# Altium PCB GripperBottomBoard.PcbDoc (part 3 of 4)
Units mm, origin at the board's own origin, x right, y up, seen from the top; angles counter-clockwise.
Board outline 79.5 x 85 mm, 6 copper layers (Top Layer, GND 01, SIG 01, PWR, GND 02, Bottom Layer), stack 1.705 mm thick; 155 components, 93 nets, 613 pads, 240 vias.
Unrouted connection lines stored in the file: 155.
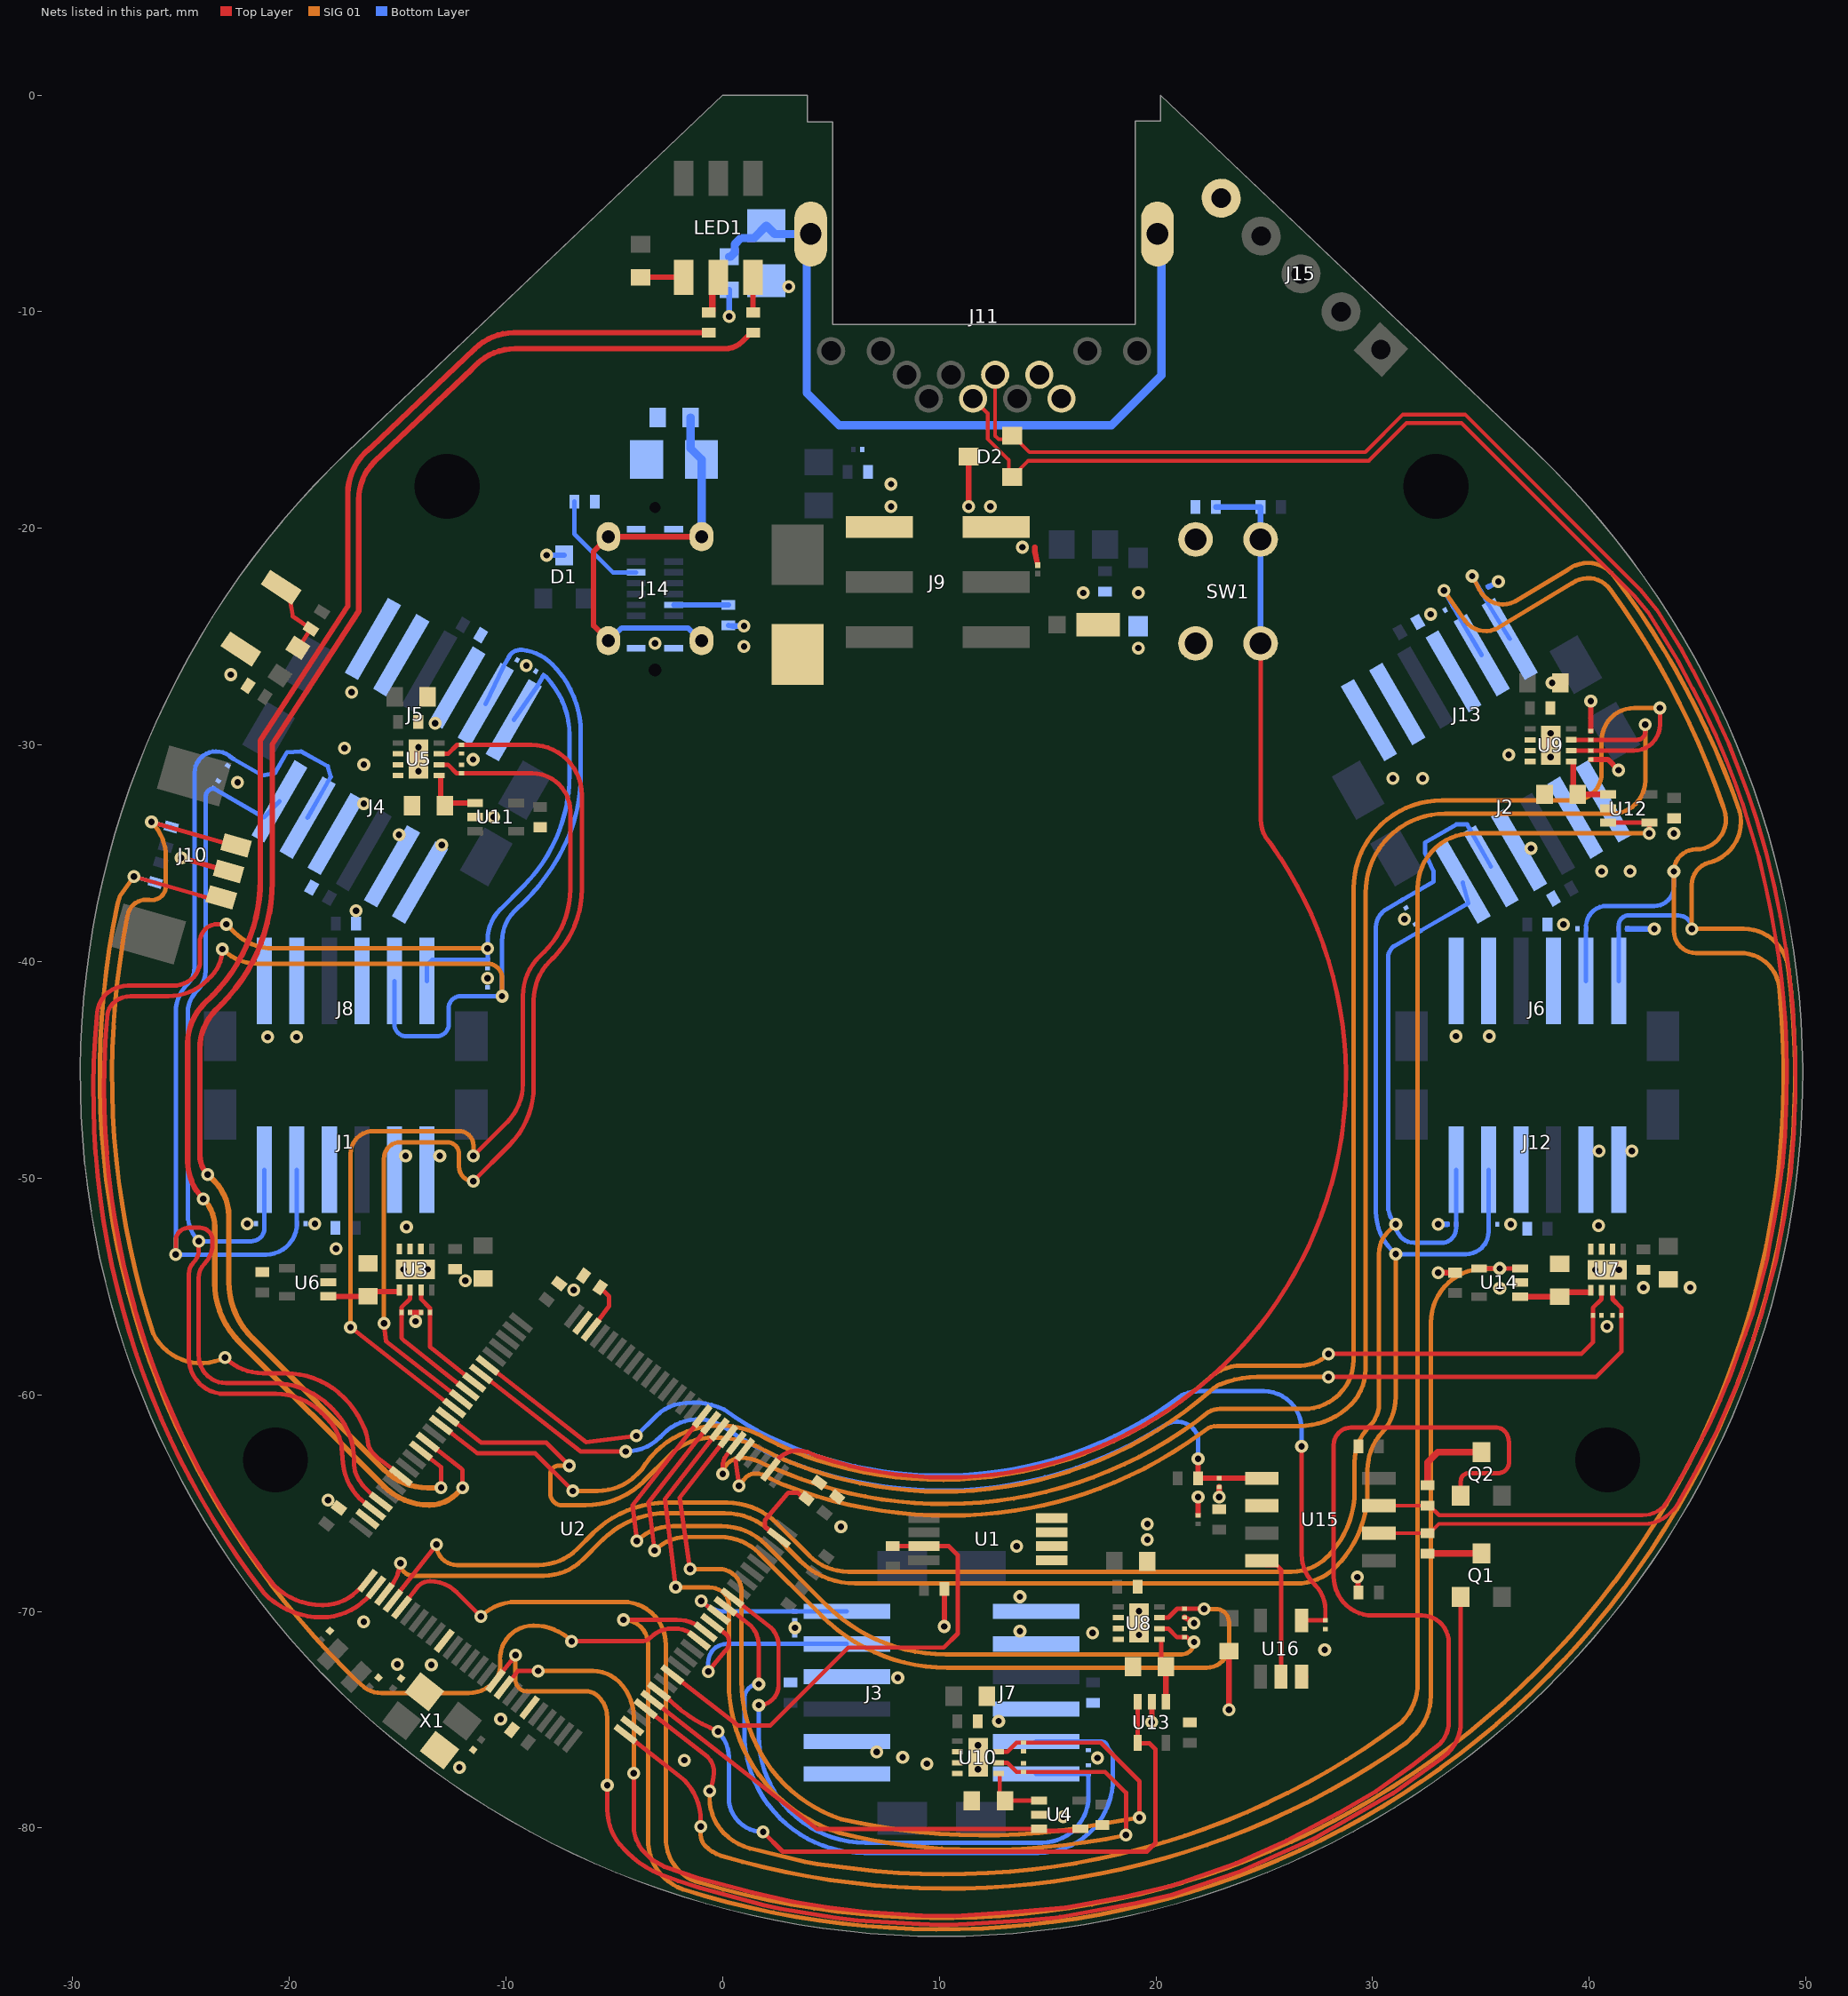
[diagram p6: the nets of this part, all layers, seen from the top]

## Via types
v1: diameter 0.6, hole 0.3, Top Layer to Bottom Layer, tented both sides, 240 vias

## Nets (pads, with @x,y where several pads share a name; then routed paths per layer and width w, separated by ;. In a path a pad name is that pad's centre, name@x,y a point inside that pad or via, vN(x,y) a via of type N, cw(c..) or ccw(c..) an arc to the next point about the centre after c; other vN are vias at no path point) (continued)
ADC_3: U2.26 U14.3 U14.4 | length 66.5
  Top Layer w0.203: U2.26@-4.104,-75.951 -4.084,-75.966 -1.844,-77.716 -1.785,-77.776 cw(c-3.647,-79.638) v1@-1.027,-79.909 ; U14.4@34.913,-54.166 v1(35.863,-54.167) U14.3@36.813,-54.167
  SIG 01 w0.203: v1(-1.014,-79.929) -1.014,-80.312 ccw(c-0.291,-80.312) -0.803,-80.823 ccw(c0.561,-79.46) -0.108,-81.268 -0.101,-81.27 ccw(c10.355,-46.023) 31.568,-76.051 31.945,-75.674 ccw(c30.156,-73.885) 32.687,-73.885 32.687,-56.666 cw(c35.186,-56.666) 35.186,-54.167 v1(35.863,-54.167)
ADC_4: U2.29 U12.3 U12.4 | length 93.9
  Top Layer w0.203: U2.29@-3.665,-74.39 -3.554,-74.478 -0.701,-76.706 ; -0.701,-76.706 cw(c-0.827,-76.866) -0.685,-76.72 cw(c-1.351,-77.399) -0.401,-77.448 cw(c-2.76,-77.326) v1(-0.6,-78.281) ; U12.3@40.87,-33.577 U12.4@42.77,-33.577 v1(42.77,-34.079)
  SIG 01 w0.203: v1(-0.6,-78.281) -0.6,-78.633 ccw(c1.684,-78.63) 0.071,-80.247 ccw(c1.944,-78.376) 1.263,-80.934 1.265,-80.935 3.799,-81.556 4.378,-81.666 6.062,-81.872 ccw(c10.32,-47.147) 31.331,-75.12 ccw(c29.535,-73.324) 32.075,-73.324 32.075,-36.619 cw(c34.615,-36.619) 34.615,-34.079 v1(42.77,-34.079)
ADC_5: U2.30 U4.3 U4.4 | length 22.3
  Top Layer w0.203: U2.30@-3.624,-73.8 U2.30@-3.251,-74.09 -2.858,-74.397 4.355,-80.033 U4.3@14.606,-80.033 14.689,-80.115 16.424,-80.115 U4.4@16.506,-80.033
ADC_6: U2.31 U13.3 U13.4 | length 35.3
  Top Layer w0.203: U2.31@-3.316,-73.406 U2.31@-2.943,-73.696 -2.545,-73.996 -2.537,-74.003 -2.528,-74.012 ccw(c2.097,-69.45) -0.22,-75.519 cw(c-0.293,-75.709) v1@-0.218,-75.52 ; v1(1.868,-80.174) 1.868,-80.181 2.772,-81.086 19.578,-81.086 19.973,-80.691 19.973,-76.355 19.708,-76.09 19.181,-76.09 U13.4@19.156,-76.065 U13.3@19.156,-74.165
  Bottom Layer w0.203: v1(-0.214,-75.538) cw(c-1.415,-76.739) 0.283,-76.739 0.283,-78.59 ccw(c1.868,-78.59) v1(1.868,-80.174)
B: R15.2 U2.91 | length 76.8
  Top Layer w0.203: U2.91@-13.926,-62.578 -13.773,-62.704 -13.542,-62.896 -12.997,-63.322 v1(-12.997,-64.291)
  Top Layer w0.254: v1(-23.765,-49.824) cw(c-22.889,-48.947) -24.129,-48.947 -24.129,-44.021 cw(c-21.589,-44.021) -23.385,-42.225 -23.138,-41.978 ccw(c-28.805,-36.309) -20.789,-36.309 -20.789,-29.968 -16.792,-23.821 -16.794,-23.819 -16.794,-18.661 cw(c-14.338,-18.661) -16.075,-16.925 -11.575,-12.646 -11.383,-12.453 cw(c-9.587,-14.249) -11.19,-12.279 cw(c-9.587,-14.249) -9.587,-11.709 0.094,-11.709 ccw(c0.094,-10.549) 0.915,-11.369 1.312,-10.973 R15.2@1.401,-10.973
  SIG 01 w0.254: v1(-23.765,-49.824) -23.471,-50.118 cw(c-25.112,-51.759) -22.792,-51.759 -22.792,-54.779 ccw(c-19.14,-54.779) -21.721,-57.362 -15.621,-63.462 ccw(c-13.62,-61.461) -13.62,-64.291 v1(-12.997,-64.291)
BOOT0: J10.1 R2.1 U2.94 | length 45.2
  Top Layer w0.203: v1(-26.364,-33.557) -22.994,-34.523 J10.1@-22.455,-34.634 J10.1@-21.928,-34.785 ; v1(-22.968,-58.277) ccw(c-21.223,-56.532) -21.223,-59 -20.18,-59 cw(c-20.18,-62.807) -17.486,-60.117 cw(c-20.603,-63.229) -16.521,-61.575 ; -16.521,-61.576 cw(c-18.527,-62.388) -16.376,-62.146 -16.358,-62.305 ccw(c-15.458,-62.036) -16.122,-62.701 -15.91,-62.913 -15.234,-63.442 -15.003,-63.633 U2.94@-14.85,-63.76
  SIG 01 w0.203: v1(-26.364,-33.557) cw(c-27.976,-35.168) -25.697,-35.168 -25.697,-36.584 cw(c-26.36,-36.49) -26.454,-37.153 ccw(c-26.601,-38.013) -27.461,-37.866 ccw(c10.086,-45.261) -26.282,-57.172 ccw(c-24.072,-56.068) v1(-22.968,-58.277)
  Bottom Layer w0.203: v1(-26.364,-33.557) -25.666,-33.757 R2.1@-25.451,-33.788
BOOT1: J10.3 R1.1 U2.37 | length 64.4
  Top Layer w0.203: v1(-27.177,-36.076) -24.168,-36.937 -23.945,-37.001 -23.723,-37.065 J10.3@-23.144,-37.037 ; J10.3@-23.196,-37.229 J10.3@-22.988,-37.288 ; v1(-6.97,-71.374) -3.767,-71.374 ccw(c-3.767,-70.716) -3.302,-71.181 cw(c-2.359,-72.124) -2.974,-70.941 cw(c-2.359,-72.124) -2.359,-70.791 -2.201,-70.791 cw(c-2.201,-72.151) -1.24,-71.189 U2.37@-1.096,-71.332
  SIG 01 w0.203: v1(-27.177,-36.076) -27.802,-36.942 -27.922,-37.303 ccw(c10.086,-45.261) -17.372,-72.72 ccw(c-1.506,-56.854) -16.694,-73.37 ccw(c-15.743,-72.427) -15.743,-73.766 -11.725,-73.766 ccw(c-11.725,-72.145) -11.722,-73.766 ccw(c-11.725,-72.145) -10.579,-73.291 ccw(c-11.311,-72.559) -10.276,-72.559 -10.276,-72.258 -10.276,-72.235 cw(c-8.736,-72.189) -8.734,-70.648 -8.721,-70.648 cw(c-8.721,-73.126) -6.971,-71.373 v1(-6.97,-71.374)
  Bottom Layer w0.203: v1(-27.177,-36.076) -26.398,-36.3 R1.1@-26.186,-36.343
BUTTON: C36.2 R16.2 SW1.3 SW1.4 U2.52 | length 67.4
  Top Layer w0.203: U2.52@2.21,-63.446 2.212,-63.443 2.367,-63.244 U2.52@2.524,-63.043 ; U2.52@2.247,-63.47 cw(c3.484,-63.867) 2.302,-63.328 cw(c3.484,-63.867) 3.879,-62.629 ; 3.913,-62.641 3.879,-62.629 ; SW1.4@24.826,-25.311 24.838,-25.322 24.838,-33.436 ccw(c26.476,-33.436) 25.062,-34.264 25.317,-34.594 cw(c10.299,-45.343) 4.393,-62.842 3.879,-62.629
  Bottom Layer w0.254: C36.2@22.766,-19.014 R16.2@24.826,-19.014 SW1.3@24.826,-20.511 SW1.4@24.826,-25.311
CAN_NH#: D2.1 J11.4 R21.1 U15.7 | length 95.4
  Top Layer w0.178: J11.4@11.556,-14.012 12.23,-14.686 12.23,-15.869 13.206,-16.845 D2.1@13.206,-17.624 ; D2.1@13.354,-17.628 14.106,-16.876 29.825,-16.876 31.561,-15.14 34.099,-15.14 42.093,-23.134 42.689,-23.841 ; U15.7@30.283,-65.116 R21.1@32.534,-65.116 32.622,-65.116 33.063,-65.557 42.455,-65.557 ccw(c42.455,-64.183) 43.427,-65.155 43.616,-64.877 ccw(c43.469,-64.777) 43.623,-64.865 44.204,-63.848 ; 42.69,-23.841 cw(c42.553,-23.955) 42.704,-23.862 43.45,-25.061 ; 43.451,-25.062 cw(c43.299,-25.155) 43.452,-25.063 44.076,-26.096 ; 44.076,-26.097 cw(c43.924,-26.188) 44.081,-26.105 44.755,-27.381 45.312,-28.445 cw(c45.155,-28.528) 45.315,-28.451 45.872,-29.616 46.317,-30.693 cw(c46.152,-30.761) 46.318,-30.697 46.786,-31.913 cw(c46.62,-31.976) 46.787,-31.916 47.066,-32.686 ; 44.204,-63.847 44.696,-62.965 ccw(c44.541,-62.878) 44.698,-62.961 45.117,-62.164 cw(c45.274,-62.247) 45.118,-62.163 45.523,-61.407 45.83,-60.729 ; 45.83,-60.728 46.041,-60.258 ccw(c45.879,-60.185) 46.043,-60.254 ; 46.043,-60.253 46.412,-59.36 ccw(c46.248,-59.292) 46.413,-59.357 46.491,-59.161 ccw(c46.326,-59.096) 46.493,-59.156 46.847,-58.157 cw(c47.015,-58.216) 46.848,-58.155 47.207,-57.189 ccw(c47.04,-57.127) 47.208,-57.186 47.546,-56.212 ccw(c47.378,-56.154) 47.549,-56.202 ; 47.067,-32.687 cw(c46.899,-32.747) 47.069,-32.694 47.289,-33.401 ; 47.29,-33.402 47.511,-34.13 47.821,-35.157 ; 47.549,-56.201 47.812,-55.25 ; 47.813,-55.249 48.207,-53.772 48.353,-52.936 48.546,-51.895 ccw(c48.372,-51.862) 48.547,-51.89 48.726,-50.773 ccw(c48.55,-50.745) 48.726,-50.77 48.909,-49.489 ccw(c48.733,-49.464) 48.91,-49.48 49.033,-48.03 ccw(c48.855,-48.015) 49.033,-48.023 ; 47.821,-35.157 cw(c47.65,-35.208) 47.824,-35.168 48.146,-36.559 ; 48.146,-36.56 cw(c47.973,-36.599) 48.147,-36.562 48.384,-37.682 ; 48.384,-37.683 cw(c48.21,-37.719) 48.386,-37.689 48.577,-38.793 ; 48.577,-38.795 48.747,-39.84 ; 48.747,-39.841 cw(c48.571,-39.869) 48.748,-39.845 48.879,-40.824 ; 48.879,-40.825 cw(c48.703,-40.848) 48.88,-40.83 48.965,-41.691 ; 48.965,-41.691 cw(c48.788,-41.708) 48.965,-41.694 49.056,-42.872 cw(c48.878,-42.886) 49.056,-42.878 49.101,-43.936 cw(c48.923,-43.944) 49.101,-43.941 49.118,-44.985 cw(c48.94,-44.988) 49.118,-44.99 49.101,-46.34 49.033,-48.023
CAN_NH_MCU: Q2.1 U2.17 | length 84.2
  Top Layer w0.203: U2.17@-10.091,-73.505 -9.755,-73.135 -9.452,-72.747 -8.516,-72.747 v1(-8.515,-72.746) ; v1(-4.104,-77.462) -4.104,-79.892 ccw(c-2.338,-79.894) -3.59,-81.14 -3.291,-81.439 -3.247,-81.472 -2.699,-81.779 -2.682,-81.785 -1.121,-82.312 -1.114,-82.314 1.367,-82.967 ccw(c1.419,-82.77) 1.373,-82.968 ; 1.374,-82.968 3.255,-83.397 ccw(c3.299,-83.199) 3.266,-83.4 ; 3.267,-83.4 4.761,-83.64 ccw(c4.794,-83.44) 4.769,-83.641 ; 4.77,-83.641 6.59,-83.864 ccw(c6.615,-83.663) 6.602,-83.865 ; 6.602,-83.866 9.184,-84.03 ccw(c9.197,-83.827) 9.193,-84.031 ; 9.194,-84.031 10.71,-84.054 ccw(c10.713,-83.851) 10.726,-84.054 ; 10.726,-84.054 13.432,-83.877 ccw(c13.419,-83.674) 13.436,-83.877 15.817,-83.671 ccw(c15.799,-83.469) 15.834,-83.669 18.512,-83.181 ccw(c18.477,-82.981) 18.523,-83.179 20.728,-82.657 ccw(c20.681,-82.459) 20.748,-82.651 23.677,-81.63 ccw(c23.61,-81.438) 23.693,-81.624 26.022,-80.579 ccw(c25.94,-80.393) 26.035,-80.573 28.381,-79.332 ccw(c28.286,-79.153) 28.389,-79.328 30.165,-78.296 ccw(c30.064,-78.12) 30.182,-78.286 31.871,-77.077 ccw(c31.753,-76.912) 31.878,-77.072 33.091,-76.118 ccw(c32.079,-75.106) 33.51,-75.106 33.51,-71.423 ccw(c32.272,-71.423) 32.272,-70.185 30.002,-70.185 cw(c30.002,-68.388) 28.205,-68.388 28.205,-62.308 cw(c29.003,-62.308) 29.003,-61.51 35.719,-61.51 cw(c35.719,-62.019) 36.106,-61.688 cw(c35.524,-62.186) 36.29,-62.186 36.29,-63.112 cw(c35.781,-63.112) 36.252,-63.306 cw(c35.781,-63.112) 35.975,-63.583 cw(c35.781,-63.112) 35.781,-63.621 34.423,-63.621 ccw(c34.423,-63.977) 34.067,-63.977 Q2.1@34.067,-64.647
  SIG 01 w0.203: v1(-8.515,-72.746) -5.991,-72.746 cw(c-5.991,-74.45) -4.786,-73.245 cw(c-6.431,-74.89) -4.104,-74.89 v1(-4.104,-77.462)
CAN_NL#: D2.2 J11.5 R20.1 U15.6 | length 96.1
  Top Layer w0.178: J11.5@12.576,-12.912 12.576,-15.729 12.735,-15.887 13.195,-15.887 D2.2@13.354,-15.728 13.404,-15.728 14.156,-16.48 29.661,-16.48 31.397,-14.743 34.263,-14.743 42.373,-22.854 43.097,-23.741 ; U15.6@30.283,-66.386 R20.1@32.533,-66.386 32.622,-66.386 33.055,-65.954 42.536,-65.954 ccw(c42.536,-64.28) 43.719,-65.464 ; 43.097,-23.741 cw(c42.959,-23.853) 43.11,-23.758 43.75,-24.771 ; 43.72,-65.464 43.95,-65.234 44.159,-64.893 ccw(c44.007,-64.8) 44.163,-64.886 44.84,-63.657 45.911,-61.626 ccw(c45.754,-61.542) 45.918,-61.613 46.823,-59.508 ccw(c46.66,-59.437) 46.828,-59.496 47.956,-56.286 ccw(c47.788,-56.227) 47.96,-56.273 48.625,-53.763 ccw(c48.453,-53.717) 48.628,-53.751 ; 43.751,-24.772 44.23,-25.548 ; 44.23,-25.548 cw(c44.078,-25.641) 44.235,-25.557 44.775,-26.558 cw(c44.618,-26.642) 44.776,-26.56 45.389,-27.735 ; 45.39,-27.736 cw(c45.231,-27.818) 45.39,-27.738 45.896,-28.75 cw(c45.737,-28.83) 45.899,-28.756 46.429,-29.916 cw(c46.267,-29.99) 46.433,-29.926 46.761,-30.784 47.055,-31.546 ; 47.056,-31.547 47.344,-32.305 ; 47.345,-32.306 cw(c47.178,-32.369) 47.347,-32.312 47.725,-33.448 ; 47.726,-33.449 cw(c47.557,-33.505) 47.728,-33.455 48.158,-34.947 cw(c47.987,-34.997) 48.159,-34.953 48.31,-35.559 cw(c48.138,-35.602) 48.311,-35.561 48.564,-36.65 ; 48.564,-36.65 cw(c48.391,-36.69) 48.565,-36.655 48.783,-37.729 48.818,-37.903 ; 48.628,-53.751 49,-51.807 ccw(c48.825,-51.774) 49.001,-51.799 49.3,-49.723 ccw(c49.124,-49.698) 49.301,-49.713 49.453,-47.884 ccw(c49.276,-47.869) 49.454,-47.876 ; 48.819,-37.904 cw(c48.644,-37.939) 48.819,-37.909 49.073,-39.4 ; 49.073,-39.4 cw(c48.897,-39.429) 49.073,-39.405 49.232,-40.541 ; 49.232,-40.542 cw(c49.056,-40.566) 49.233,-40.546 49.329,-41.416 49.329,-41.42 49.411,-42.253 cw(c49.234,-42.27) 49.412,-42.262 49.48,-43.635 ; 49.454,-47.876 49.522,-46.02 ccw(c49.344,-46.013) 49.522,-46.013 49.512,-44.578 ccw(c49.335,-44.579) 49.512,-44.574 49.48,-43.638 ccw(c49.302,-43.644) 49.48,-43.636
CAN_NL_MCU: Q1.1 U2.16 | length 62
  Top Layer w0.203: U2.16@-10.485,-73.198 v1(-9.559,-72.013) ; v1(-5.326,-78.019) -5.321,-78.024 -5.321,-79.146 ccw(c-2.781,-79.146) -4.577,-80.942 -4.393,-81.126 -4.392,-81.127 ccw(c-1.156,-77.891) -2.907,-82.119 -2.904,-82.121 -2.071,-82.432 -1.014,-82.77 1.934,-83.572 2.696,-83.733 5.217,-84.137 6.217,-84.26 9.087,-84.437 9.996,-84.467 ; 9.996,-84.467 10.433,-84.467 11.308,-84.437 13.938,-84.26 15.133,-84.159 15.562,-84.109 19.086,-83.469 20.754,-83.077 23.891,-81.999 27.245,-80.507 ccw(c27.163,-80.321) 27.264,-80.497 30.939,-78.393 ccw(c30.838,-78.217) 30.957,-78.382 33.157,-76.803 33.478,-76.528 ccw(c32.056,-75.106) 34.067,-75.106 Q1.1@34.067,-69.326
  SIG 01 w0.203: v1(-9.559,-72.013) ccw(c-9.536,-72.036) -9.569,-72.036 -9.569,-73.117 ccw(c-8.964,-73.117) -9.392,-73.545 ccw(c-9.065,-73.219) -9.065,-73.68 -6.337,-73.68 cw(c-6.337,-74.541) -5.728,-73.932 cw(c-6.699,-74.903) -5.326,-74.903 v1(-5.326,-78.019)
CAN_RX: D4.2 U2.81 U16.4 | length 52.1
  Top Layer w0.203: U2.81@-10.848,-58.638 -10.451,-58.939 -10.208,-59.129 -6.299,-62.178 v1(-3.984,-61.892) ; U16.4@26.721,-70.412 D4.2@27.817,-70.412 27.817,-69.932 ccw(c26.169,-69.932) 27.334,-68.767 27.284,-68.717 cw(c28.645,-67.356) 26.721,-67.356 v1(26.721,-62.373)
  Bottom Layer w0.203: v1(-3.984,-61.892) -3.067,-60.974 cw(c-1.624,-62.416) -1.994,-60.411 cw(c-1.38,-63.747) 0.053,-60.672 cw(c-0.033,-60.856) 0.086,-60.691 ; 0.087,-60.692 ccw(c8.107,-49.763) 2.677,-62.184 ccw(c10.079,-45.251) 21.173,-60.03 cw(c21.798,-61.16) 21.468,-59.912 cw(c22.067,-62.177) 22.067,-59.834 ; 22.068,-59.834 24.972,-59.834 cw(c24.972,-61.583) 26.721,-61.583 v1(26.721,-62.373)
CAN_RX#: U15.4 U16.2 | length 6
  Top Layer w0.203: U15.4@24.883,-67.656 25.081,-67.855 25.556,-67.855 25.771,-68.069 U16.2@25.771,-73.012
CAN_TX: D5.2 R6.2 U2.82 U15.1 | length 41.2
  Top Layer w0.203: U2.82@-11.156,-59.032 -10.759,-59.333 -10.516,-59.523 -6.61,-62.57 -6.555,-62.613 -6.485,-62.613 v1(-4.471,-62.613)
  Top Layer w0.254: v1(21.946,-62.955) R6.2@21.946,-63.846 D5.2@22.917,-63.846 U15.1@24.883,-63.846
  Bottom Layer w0.203: v1(-4.471,-62.613) ccw(c-4.471,-60.374) -2.887,-61.957 -2.776,-61.845 -2.758,-61.827 cw(c-1.146,-63.352) 0.121,-61.53 ccw(c7.761,-50.58) 2.413,-62.814 ccw(c10.086,-45.261) 20.35,-61.436 cw(c20.963,-62.276) 21.946,-61.939 v1(21.946,-62.955)
CH_GND: C33.1 J14.S1 J14.S2 J14.S3 J14.S4 R19.1 | length 20.2
  Top Layer w0.254: J14.S2@-5.274,-25.184 -5.96,-24.498 -5.96,-21.07 J14.S1@-5.274,-20.384 J14.S4@-0.974,-20.384
  Bottom Layer w0.254: J14.S2@-5.274,-25.184 -5.242,-25.184 -4.653,-24.595 -1.595,-24.595 -1.006,-25.184 J14.S3@-0.974,-25.184
  Bottom Layer w0.381: R19.1@-1.482,-14.884 -1.482,-16.307 C33.1@-0.974,-16.815 J14.S4@-0.974,-20.384
EN_1A: D9.2 D39.2 J1.5 J4.5 U2.97 | length 62.6
  Top Layer w0.203: v1(-25.241,-53.523) -25.241,-52.882 cw(c-24.646,-52.882) -24.646,-52.287 -24.124,-52.287 cw(c-24.124,-52.867) -23.544,-52.867 -23.544,-53.041 cw(c-24.847,-53.041) -23.926,-53.962 ccw(c-23.314,-54.574) -24.179,-54.574 -24.179,-58.195 ccw(c-22.917,-58.195) -22.917,-59.457 -20.74,-59.457 -20.738,-59.457 cw(c-20.737,-63.176) -18.11,-60.544 -17.985,-60.669 cw(c-20.337,-63.019) -17.013,-63.059 cw(c-17.216,-63.055) -17.013,-63.063 ccw(c-15.37,-63.131) -16.962,-63.541 ccw(c-15.37,-63.131) -16.96,-63.55 ccw(c-15.106,-62.915) -16.492,-64.3 -16.489,-64.303 -16.157,-64.635 -16.157,-64.665 U2.97@-15.773,-64.942
  Bottom Layer w0.203: J1.5@-19.649,-49.611 D9.2@-19.649,-52.092 cw(c-21.08,-52.092) -21.08,-53.523 v1(-25.241,-53.523) -25.241,-42.317 cw(c-23.457,-42.317) -24.718,-41.056 -24.691,-41.029 ccw(c-25.459,-40.261) -24.373,-40.261 -24.373,-31.287 cw(c-23.384,-31.287) -23.384,-30.298 cw(c-23.384,-31.349) D39.2@-22.64,-30.606 -21.246,-31.411 -20.678,-31.307 -20.108,-30.335 -19.474,-30.298 -18.228,-30.976 -18.088,-31.466 -18.223,-31.7 J4.5@-19.157,-33.353
EN_1B: D10.2 D40.2 J1.6 J4.6 U2.98 | length 49.4
  Top Layer w0.203: v1(-24.179,-52.907) -24.179,-53.299 cw(c-25.03,-53.299) -24.428,-53.9 ccw(c-23.926,-54.403) -24.637,-54.403 -24.637,-58.301 ccw(c-22.984,-58.301) -22.984,-59.953 -20.62,-59.953 ; -20.619,-59.953 cw(c-20.619,-62.92) -18.523,-60.82 -18.281,-61.062 cw(c-20.133,-62.911) -17.613,-62.206 -17.524,-63.149 ccw(c-14.856,-62.885) -16.519,-64.987 -16.471,-65.025 U2.98@-16.082,-65.325
  Bottom Layer w0.203: -24.687,-42.355 -24.687,-51.681 ccw(c-22.953,-51.681) v1(-24.179,-52.907) -21.753,-52.907 ccw(c-21.753,-52.304) -21.149,-52.304 D10.2@-21.149,-52.092 J1.6@-21.149,-49.611 ; -24.687,-42.354 cw(c-23.322,-42.354) -24.583,-41.831 cw(c-23.012,-42.482) -24.215,-41.28 ccw(c-25.068,-40.427) -23.862,-40.427 -23.862,-40.426 -23.862,-32.391 cw(c-23.48,-32.391) D40.2@-23.48,-32.009 -21.17,-33.343 J4.6@-20.456,-32.603
EN_2A: D13.2 D37.2 J5.5 J8.5 U2.1 | length 84.3
  Top Layer w0.203: v1(-23.093,-39.424) cw(c-24.875,-39.424) -23.615,-40.685 -23.782,-40.852 cw(c-25.578,-39.055) -25.578,-41.595 -25.874,-41.595 -27.327,-41.595 ccw(c-27.325,-42.753) -28.143,-41.934 ccw(c-27.52,-42.558) -28.402,-42.566 ccw(c7.053,-45.789) -28.548,-45.789 ccw(c9.123,-45.789) -20.713,-68.787 ccw(c-18.496,-66.57) -18.499,-69.706 -18.431,-69.706 ccw(c-18.433,-67.502) -16.875,-69.06 U2.1@-16.395,-68.58
  SIG 01 w0.203: v1(-23.093,-39.424) ccw(c-21.473,-37.804) -21.473,-40.095 -10.849,-40.095 cw(c-10.849,-40.762) -10.181,-40.762 v1(-10.181,-41.595)
  Bottom Layer w0.203: J8.5@-15.149,-40.895 -15.149,-42.895 ccw(c-14.599,-42.895) -14.599,-43.445 -13.195,-43.445 ccw(c-13.195,-42.895) -12.645,-42.895 -12.645,-42.146 cw(c-12.094,-42.146) -12.094,-41.595 D13.2@-10.849,-41.595 v1(-10.181,-41.595) -10.181,-39.054 cw(c-8.211,-39.054) -9.609,-37.666 -9.539,-37.603 ccw(c-16.134,-30.248) -8.151,-36.067 ccw(c-15.476,-30.728) -7.167,-34.35 ccw(c-13.982,-31.379) -6.547,-31.379 -6.547,-29.445 ccw(c-11.011,-29.445) -7.854,-26.289 ccw(c-9.46,-27.821) -9.26,-25.611 -9.269,-25.61 ccw(c-9.332,-26.208) D37.2@-9.823,-25.86 ; J5.5@-10.939,-28.103 -10.122,-26.383 D37.2@-9.83,-25.876
EN_2B: D14.2 D38.2 J5.6 J8.6 U2.2 | length 76.3
  Top Layer w0.203: -24.129,-39.103 -24.129,-40.094 cw(c-24.332,-40.094) -24.132,-40.132 cw(c-25.473,-39.862) -24.394,-40.703 cw(c-24.554,-40.577) -24.414,-40.724 cw(c-25.378,-39.717) -25.379,-41.111 -27.456,-41.111 ccw(c-27.456,-42.591) -28.503,-41.545 -28.548,-41.59 ccw(c-27.325,-42.561) -28.887,-42.561 ccw(c8.91,-46.006) -21.158,-69.166 -21.15,-69.176 ccw(c-18.511,-66.537) -18.511,-70.269 ccw(c-18.511,-67.359) -16.453,-69.418 -16.313,-69.277 U2.2@-16.001,-68.888 ; -24.129,-39.102 cw(c-23.279,-39.102) -23.88,-38.502 -23.879,-38.5 cw(c-23.333,-39.048) -23.333,-38.275 v1(-22.913,-38.275)
  SIG 01 w0.203: v1(-22.913,-38.275) -22.539,-38.648 ccw(c-20.743,-36.852) -20.743,-39.392 v1(-10.849,-39.392)
  Bottom Layer w0.203: J8.6@-13.649,-40.895 -13.649,-40.163 -13.401,-39.915 D14.2@-10.849,-39.915 v1(-10.849,-39.392) -10.849,-39.005 cw(c-8.842,-39.005) -10.262,-37.586 -9.182,-36.506 ccw(c-14.403,-31.351) -7.065,-31.351 ; J5.6@-9.64,-28.853 -8.555,-27.287 D38.2@-8.272,-26.796 cw(c-8.306,-26.996) -8.161,-26.854 cw(c-10.92,-29.546) -7.065,-29.546 -7.065,-31.35
EN_3A: D20.2 D41.2 J2.5 J12.5 U2.3 | length 95.3
  Top Layer w0.203: U2.3@-15.607,-69.196 -15.561,-69.15 ccw(c-17.294,-67.417) v1(-14.87,-67.774)
  SIG 01 w0.203: v1(-14.87,-67.774) ccw(c-14.296,-67.774) -14.296,-68.347 -8.252,-68.347 ccw(c-8.252,-65.807) -6.456,-67.603 -5.562,-66.71 cw(c-2.542,-69.73) -2.542,-65.458 0.085,-65.458 cw(c0.085,-68.571) 2.285,-66.37 3.57,-67.654 ccw(c6.111,-65.113) 6.111,-68.707 26.476,-68.707 ccw(c26.476,-66.149) 28.285,-67.959 ccw(c24.699,-64.371) 29.763,-64.66 29.763,-63.473 cw(c32.358,-63.473) 30.297,-61.897 30.322,-61.872 ccw(c28.526,-60.076) 30.545,-61.617 ccw(c28.526,-60.076) 31.066,-60.076 v1(31.066,-53.501)
  Bottom Layer w0.203: v1(31.066,-53.501) 30.895,-53.331 cw(c32.691,-51.535) 30.151,-51.535 30.151,-38.409 cw(c31.086,-38.406) 30.425,-37.746 30.526,-37.644 D41.2@31.336,-37.17 32.804,-36.312 32.804,-35.815 32.422,-35.002 32.422,-34.504 33.862,-33.671 34.359,-33.671 34.52,-33.95 J2.5@35.455,-35.603 ; v1@31.092,-53.501 34.312,-53.501 ccw(c34.312,-52.462) 35.351,-52.462 D20.2@35.351,-52.124 J12.5@35.351,-49.611
EN_3B: D21.2 D42.2 J2.6 J12.6 U2.4 | length 87.6
  Top Layer w0.203: U2.4@-15.213,-69.504 -14.917,-69.102 v1(-13.207,-66.913)
  SIG 01 w0.203: v1(-13.207,-66.913) ccw(c-12.264,-66.913) -12.264,-67.855 -8.502,-67.855 ccw(c-8.502,-65.315) -6.706,-67.111 -5.983,-66.388 cw(c-2.583,-69.788) -2.583,-64.98 0.205,-64.98 cw(c0.205,-68.253) 2.519,-65.939 4.001,-67.42 ccw(c5.797,-65.624) 5.797,-68.164 26.247,-68.164 ccw(c26.248,-65.819) 27.906,-67.478 ccw(c24.864,-64.435) 29.166,-64.435 29.166,-63.126 cw(c31.547,-63.126) 29.864,-61.443 ccw(c28.817,-60.397) 30.297,-60.397 30.297,-53.455 30.297,-53.443 cw(c31.634,-53.447) 30.688,-52.502 v1(31.066,-52.124)
  Bottom Layer w0.203: 30.711,-39.825 30.711,-51.269 ccw(c31.921,-51.269) v1(31.066,-52.124) ccw(c31.922,-52.124) 31.922,-52.98 33.18,-52.98 ccw(c33.18,-52.309) 33.851,-52.309 D21.2@33.851,-52.124 J12.6@33.851,-49.611 ; 30.711,-39.824 cw(c31.379,-39.824) 30.907,-39.353 30.951,-39.308 D42.2@32.167,-38.606 34.419,-37.306 J2.6@34.156,-36.353
EN_4A: D6.2 D24.2 J6.5 J13.5 U2.5 | length 148.7
  Top Layer w0.203: U2.5@-14.819,-69.811 -14.741,-69.711 -14.514,-69.417 -14.06,-68.836 ; -14.06,-68.836 cw(c-13.9,-68.961) -14.042,-68.816 cw(c-13.513,-69.36) -13.512,-68.601 cw(c-13.513,-70.358) -12.271,-69.116 ; -12.27,-69.117 v1(-11.154,-70.232)
  SIG 01 w0.203: v1(-11.154,-70.232) cw(c-9.526,-71.861) -9.526,-69.558 -4.602,-69.558 cw(c-4.602,-71.541) -2.619,-71.541 -2.619,-80.392 ccw(c-0.532,-80.495) -1.014,-82.529 ccw(c10.086,-45.261) 48.774,-41.341 ccw(c46.992,-41.39) 46.943,-39.608 44.927,-39.608 cw(c44.927,-38.583) 43.903,-38.583 v1(43.903,-35.835) cw(c44.918,-35.835) 44.917,-34.819 ccw(c44.918,-33.435) 46.23,-32.992 46.156,-32.78 ccw(c10.086,-45.261) 40.965,-22.827 ccw(c39.942,-23.549) 39.219,-22.526 35.803,-24.583 cw(c35.213,-23.561) 34.19,-24.151 v1(33.29,-22.873)
  Bottom Layer w0.203: v1(33.29,-22.873) D6.2@33.694,-23.573 34.066,-24.218 J13.5@35.03,-25.853 ; J6.5@39.851,-40.895 D24.2@39.851,-38.488 ; D24.2@39.856,-38.488 cw(c40.799,-38.381) 40.799,-37.431 42.999,-37.431 ccw(c42.999,-36.527) 43.903,-36.527 v1(43.903,-35.835)
EN_4B: D25.2 D35.2 J6.6 J13.6 U2.38 | length 138.8
  Top Layer w0.203: v1(-4.578,-70.383) -2.123,-70.383 cw(c-2.123,-72.265) U2.38@-0.793,-70.934
  SIG 01 w0.203: v1(-4.578,-70.383) cw(c-4.578,-71.518) -3.443,-71.518 -3.443,-80.495 ccw(c-1.033,-80.554) -1.847,-82.823 ccw(c10.086,-45.261) 49.194,-40.377 ccw(c47.099,-40.584) 46.892,-38.488 v1(44.731,-38.488) 44.731,-36.445 cw(c45.772,-36.445) 45.342,-35.497 cw(c45.765,-36.43) 45.52,-35.435 ccw(c45.056,-33.546) 46.947,-33.091 ccw(c45.056,-33.546) 46.944,-33.081 ccw(c9.728,-45.959) 41.138,-22.204 ccw(c39.927,-23.11) 39.021,-21.899 36.566,-23.378 cw(c36.02,-22.285) 34.926,-22.831 v1(34.594,-22.204)
  Bottom Layer w0.203: v1(34.594,-22.204) D35.2@34.995,-22.897 35.334,-23.485 J13.6@36.329,-25.103 ; J6.6@41.351,-40.895 D25.2@41.351,-38.488 41.351,-38.332 cw(c41.813,-38.332) 41.813,-37.87 44.112,-37.87 cw(c44.112,-38.488) v1(44.731,-38.488)
EN_5A: D28.2 J3.5 U2.39 | length 10.2
  Top Layer w0.203: v1(-0.662,-72.775) 0.092,-71.846 cw(c0.25,-71.973) 0.106,-71.83 0.131,-71.805 ccw(c-0.278,-71.397) 0.3,-71.397 ccw(c-0.189,-71.397) 0.157,-71.051 -0.092,-70.856 U2.39@-0.481,-70.544
  Bottom Layer w0.203: v1(-0.662,-72.775) -0.662,-72.345 cw(c0.182,-72.345) 0.182,-71.5 D28.2@3.329,-71.5 J3.5@5.732,-71.5
EN_5B: D29.2 J3.6 U2.40 | length 7.9
  Top Layer w0.203: v1(-0.993,-69.513) -0.568,-69.846 U2.40@-0.173,-70.15
  Bottom Layer w0.203: v1(-0.993,-69.513) ccw(c0.182,-68.338) 0.182,-70 D29.2@3.329,-70 J3.6@5.732,-70
EN_6A: D32.2 J7.5 U2.41 | length 34.5
  Top Layer w0.203: U2.41@-0.238,-69.466 U2.41@0.135,-69.756 0.513,-70.041 1.294,-70.65 cw(c0.402,-71.542) 1.663,-71.542 v1(1.663,-73.357)
  Bottom Layer w0.203: v1(1.663,-73.357) ccw(c1.663,-74.017) 1.002,-74.017 1.002,-75.601 ccw(c6.554,-75.601) 6.554,-81.153 14.568,-81.153 ccw(c14.568,-77.705) 18.015,-77.705 18.015,-76.61 17.819,-76.355 17.705,-76.108 17.678,-76.081 17.648,-76.05 ccw(c17.406,-76.61) 17.406,-76 D32.2@16.885,-76 J7.5@14.461,-76
EN_6B: D33.2 J7.6 U2.42 | length 30.8
  Top Layer w0.203: U2.42@0.07,-69.072 U2.42@0.443,-69.362 0.821,-69.647 2.237,-70.753 cw(c1.412,-71.577) 2.578,-71.577 2.578,-73.409 cw(c1.663,-73.409) 2.525,-73.716 cw(c1.663,-73.409) 1.97,-74.271 cw(c1.663,-73.409) v1(1.663,-74.324)
  Bottom Layer w0.203: v1@1.663,-74.578 1.663,-75.744 ccw(c6.588,-75.744) 6.588,-80.669 14.747,-80.669 ccw(c14.747,-78.531) 16.885,-78.531 D33.2@16.885,-77.5 J7.6@14.461,-77.5
EVENT: R22.2 U1.7 U2.33 | length 22.5
  Top Layer w0.203: U2.33@-2.328,-72.908 -1.95,-73.193 0.71,-75.27 2.195,-75.27 5.799,-71.666 10.203,-71.666 10.851,-71.018 10.851,-67.394 10.443,-66.986 U1.7@9.291,-66.986 R22.2@7.85,-66.986
G: R14.2 U2.90 | length 78.4
  Top Layer w0.203: U2.90@-13.618,-62.184 -13.226,-62.492 -12.098,-63.374 -12.007,-63.464 v1(-12.007,-64.291)
  Top Layer w0.254: v1(-23.971,-50.952) cw(c-22.241,-49.223) -24.687,-49.223 -24.687,-43.755 cw(c-22.147,-43.755) -23.943,-41.959 -23.55,-41.565 ccw(c-28.896,-36.217) -21.334,-36.217 ; -21.334,-36.216 -21.334,-29.787 -17.302,-23.587 -17.302,-18.42 ; -17.302,-18.419 cw(c-14.61,-18.419) -16.285,-16.312 -16.207,-16.251 -11.44,-11.717 cw(c-9.644,-13.513) -9.644,-10.973 R14.2@-0.647,-10.973
  SIG 01 w0.254: v1(-23.971,-50.952) cw(c-25.246,-52.227) -23.443,-52.227 -23.443,-54.833 ccw(c-19.623,-54.834) -22.324,-57.536 -15.65,-64.209 ccw(c-13.536,-62.095) -13.536,-65.085 ccw(c-13.536,-63.309) -12.28,-64.565 v1(-12.007,-64.291)
GND: C1.1 C2.1 C3.1 C4.1 C5.1 C6.1 C7.1 C8.1 C9.1 C10.1 C11.1 C12.2 C13.1 C14.2 C15.1 C16.1 C17.1 C18.1 C19.1 C20.2 C21.1 C22.1 C23.1 C24.1 C25.1 C26.1 C27.1 C28.2 C29.1 C30.1 C31.1 C32.1 C33.2 C34.1 C35.1 C36.1 C37.1 C38.1 C39.1 C40.1 C41.1 C42.2 C43.2 C44.2 C45.2 C47.1 C49.1 C50.1 D1.3 D2.3 D3.1 D4.1 D5.1 D6.1 D7.1 D8.1 D9.1 D10.1 D11.1 D12.1 D13.1 D14.1 D15.1 D16.1 D17.1 D18.1 D19.1 D20.1 D21.1 D22.1 D23.1 D24.1 D25.1 D26.1 D27.1 D28.1 D29.1 D30.1 D31.1 D32.1 D33.1 D34.1 D35.1 D36.2 D37.1 D38.1 D39.1 D40.1 D41.1 D42.1 J1.4 J2.4 J3.4 J4.4 J5.4 J6.4 J7.4 J8.4 J9.5 J9.6 J10.2 J11.7 J11.8 J12.4 J13.4 J14.A1 J14.A12 J14.B1 J14.B12 J15.5 R5.1 R7.1 R8.1 R9.1 R10.1 R11.1 R12.1 R17.2 R18.2 R19.2 R25.2 SW1.1 SW1.2 SW3.2 U1.1 U1.2 U1.3 U1.4 U2.10 U2.20 U2.27 U2.74 U2.99 U3.7 U3.9 U4.2 U5.7 U5.9 U6.2 U7.7 U7.9 U8.7 U8.9 U9.7 U9.9 U10.7 U10.9 U11.2 U12.2 U13.2 U14.2 U15.2 U16.3 X1.2 X1.4 | length 23
  Top Layer w0.254: v1(-24.988,-35.208) -23.302,-35.691 J10.2@-22.8,-35.835 ; D8.1@-14.389,-56.191 D7.1@-13.946,-56.191 ; R7.1@-14.335,-32.806 R7.1@-14.276,-33.123 ; v1(10.23,-70.693) C1.1@10.23,-68.963 ; v1(11.354,-18.995) D2.3@11.354,-16.678 ; 14.409,-20.869 14.409,-21.062 14.504,-21.504 D17.1@14.539,-21.664 ; v1(19.806,-75.115) U13.2@19.806,-74.165 ; D30.1@21.316,-70.273 21.611,-70.426 cw(c21.354,-70.919) 21.714,-70.495 v1@21.747,-70.526 ; D34.1@21.946,-65.535 v1(21.946,-64.709) ; v1(22.917,-64.709) D5.1@22.917,-64.246 ; v1(23.372,-74.53) C49.1@23.372,-71.836 ; U16.3@26.721,-73.012 U16.3@26.894,-73.012 ; v1@29.295,-68.357 v1(29.295,-68.412) 29.319,-68.436 29.319,-69.106 C47.1@29.343,-69.13 ; v1(33.021,-54.361) C43.2@33.806,-54.361 ; D23.1@40.067,-30.665 40.85,-30.665 v1(41.349,-31.164) ; D22.1@40.067,-29.36 v1(40.067,-27.974) v1@40.133,-28.041
  Bottom Layer w0.254: v1(-8.129,-21.241) D1.3@-7.322,-21.241 ; R18.2@0.266,-24.474 0.456,-24.509 v1(0.986,-24.509) ; v1(0.301,-10.216) R25.2@0.301,-8.984 ; v1(33.021,-52.124) D21.1@33.451,-52.124 ; D35.1@35.341,-22.697 v1(35.803,-22.459) ; D25.1@41.751,-38.488 v1(42.999,-38.488)
  other v1: 15.718,-79.482 -12.15,-77.206 9.432,-77.03 -1.762,-76.866 17.301,-76.762 12.736,-75.063 -10.248,-74.962 8.083,-73.06 -13.443,-72.468 -15.014,-72.448 27.786,-71.764 17.075,-70.991 3.337,-70.753 21.756,-70.535 -16.565,-70.471 13.564,-66.986 19.603,-66.686 5.459,-66.087 19.603,-65.961 -18.208,-64.855 40.819,-56.841 -14.17,-56.604 -6.872,-55.161 35.863,-55.072 42.503,-55.047 44.657,-55.047 -11.876,-54.728 -17.841,-53.26 -14.594,-52.246 40.421,-52.187 36.374,-52.124 -21.944,-52.104 -18.82,-52.104 -10.849,-40.768 38.808,-38.285 31.461,-38.041 -16.918,-37.646 37.314,-34.769 43.903,-34.079 -10.575,-33.329 -16.559,-32.711 -22.387,-31.727 -16.559,-30.907 -11.516,-30.667 36.278,-30.457 -13.265,-28.997 38.286,-27.133 -22.703,-26.754 -9.061,-26.335 19.18,-25.527 0.986,-25.453 -3.124,-25.309 32.675,-23.967 16.645,-22.978 19.18,-22.978 13.828,-20.869 7.773,-18.995 12.354,-18.995 7.773,-17.958 3.05,-8.846
IN1_1: D7.2 U2.83 U3.3 | length 5.4
  Top Layer w0.203: U3.3@-13.924,-55.161 -13.924,-55.578 -13.513,-55.989 D7.2@-13.513,-56.191 -13.513,-57.772 -13.398,-57.887 -11.854,-59.115 U2.83@-11.464,-59.426
IN1_2: D11.2 U2.85 U5.3 | length 46.2
  Top Layer w0.203: v1(-15.634,-56.694) -15.531,-57.532 U2.85@-12.479,-59.916 ; U5.3@-13.087,-30.406 -12.67,-30.406 -12.258,-29.995 D11.2@-12.056,-29.995 -8.825,-29.995 cw(c-8.825,-32.319) -6.501,-32.319 -6.501,-36.658 cw(c-10.967,-36.658) -7.809,-39.817 -7.977,-39.985 ccw(c-6.181,-41.781) -8.721,-41.781 -8.721,-45.751 cw(c-12.591,-45.751) -9.855,-48.487 v1(-11.503,-50.136) ; U2.85@-12.442,-59.869 U2.85@-12.079,-60.214
  SIG 01 w0.203: v1(-15.634,-56.694) -15.634,-49.09 cw(c-14.882,-49.09) -14.882,-48.338 -12.71,-48.338 cw(c-12.71,-48.883) -12.165,-48.883 -12.165,-49.474 ccw(c-11.503,-49.474) v1(-11.503,-50.136)
IN1_3: D18.2 U2.87 U7.3 | length 64.4
  Top Layer w0.203: U2.87@-12.695,-61.002 -12.298,-61.303 -12.055,-61.493 -11.201,-62.16 -11.145,-62.202 -11.076,-62.202 -8.142,-62.202 v1(-7.076,-63.268) ; v1(27.967,-59.178) 40.306,-59.178 41.474,-58.01 D18.2@41.474,-56.326 41.474,-55.985 41.07,-55.581 U7.3@41.07,-55.175
  SIG 01 w0.203: v1(-7.076,-63.268) -7.568,-63.268 ccw(c-7.568,-63.649) -7.949,-63.649 -7.949,-64.565 ccw(c-7.418,-64.565) -7.418,-65.096 -6.323,-65.096 ; -6.322,-65.096 ccw(c-6.322,-61.307) -3.642,-63.986 -2.444,-62.788 cw(c-0.493,-64.738) -0.39,-61.981 cw(c-0.263,-66.467) 1.513,-62.346 cw(c1.432,-62.533) 1.53,-62.355 ; 1.531,-62.355 ccw(c7.873,-50.986) 2.764,-62.96 ccw(c10.137,-45.68) 22.484,-59.84 22.511,-59.814 cw(c23.529,-60.875) 22.967,-59.516 cw(c24.669,-63.625) 24.669,-59.178 v1(27.967,-59.178)
IN1_4: D22.2 U2.55 U9.3 | length 78
  Top Layer w0.203: v1(0.757,-64.201) 0.601,-63.059 0.716,-62.912 U2.55@1.028,-62.523 ; U9.3@39.167,-29.76 D22.2@40.067,-29.76 ; D22.2@40.067,-29.76 42.205,-29.76 ccw(c42.205,-29.385) 42.581,-29.385 v1(42.581,-29.055)
  SIG 01 w0.203: v1(0.757,-64.201) 0.98,-63.905 cw(c1.522,-64.314) 1.52,-63.635 cw(c1.52,-64.723) 2.13,-63.821 2.188,-63.861 ccw(c4.99,-58.672) 2.867,-64.174 ; 2.867,-64.174 ccw(c10.381,-44.708) 13.49,-65.341 ccw(c10.656,-46.531) 18.054,-64.055 ccw(c10.253,-45.578) 22.109,-61.756 22.399,-61.543 cw(c22.817,-62.365) 22.817,-61.443 26.601,-61.443 26.602,-61.443 ccw(c26.604,-58.06) 28.995,-60.452 ccw(c27.364,-58.82) 29.671,-58.819 29.671,-36.841 cw(c33.344,-36.841) 33.344,-33.168 41.062,-33.168 ccw(c41.062,-31.649) 42.581,-31.649 v1(42.581,-29.055)
IN1_5: D26.2 U2.57 U10.3 | length 45.5
  Top Layer w0.203: v1(-1.505,-68.039) -1.983,-64.749 -0.068,-62.299 U2.57@0.24,-61.907 ; U10.3@12.737,-76.479 13.137,-76.479 13.563,-76.053 D26.2@13.889,-76.053 17.452,-76.053 19.238,-77.839 v1(19.238,-79.523)
  SIG 01 w0.203: v1(-1.505,-68.039) -0.181,-68.039 -0.18,-68.039 cw(c-0.18,-69.114) 0.581,-68.355 cw(c-0.12,-69.054) 0.87,-69.054 0.87,-73.194 ccw(c7.584,-73.212) 5.467,-79.583 5.476,-79.585 ccw(c12.004,-51.531) 17.324,-79.839 19.137,-79.534 v1@19.241,-79.517 ; v1@19.131,-79.497 v1@19.238,-79.497
IN1_6: D30.2 U2.59 U8.3 | length 41
  Top Layer w0.203: v1(-3.143,-67.188) -3.416,-64.959 -0.857,-61.683 U2.59@-0.548,-61.291 ; U8.3@20.165,-70.284 20.57,-70.284 20.982,-69.873 v1@22.215,-69.873
  SIG 01 w0.203: v1(-3.143,-67.188) cw(c-1.625,-68.706) -1.625,-66.56 -0.115,-66.56 cw(c-0.116,-69.079) 1.667,-67.299 4.562,-70.194 4.563,-70.195 ccw(c10.36,-64.404) 10.363,-72.598 ; 10.364,-72.598 22.33,-72.598 ccw(c22.33,-71.557) 23.372,-71.557 23.372,-70.504 ccw(c22.751,-70.504) 22.751,-69.883 v1(22.225,-69.883)
IN2_1: D8.2 U2.84 U3.2 | length 6.3
  Top Layer w0.203: U3.2@-14.426,-55.161 -14.426,-55.566 -14.826,-55.966 D8.2@-14.826,-56.191 -14.826,-57.37 -14.638,-57.558 -12.843,-58.986 -12.166,-59.515 U2.84@-11.771,-59.82
IN2_2: D12.2 U2.86 U5.2 | length 45.8
  Top Layer w0.203: v1(-17.177,-56.88) -12.787,-60.31 -12.689,-60.383 U2.86@-12.387,-60.608 ; U5.2@-13.086,-30.909 -12.681,-30.909 -12.281,-31.308 D12.2@-12.056,-31.308 -8.789,-31.308 cw(c-8.789,-33.063) -7.034,-33.063 -7.034,-36.669 cw(c-11.092,-36.669) -8.223,-39.539 -8.475,-39.79 ccw(c-6.679,-41.587) -9.219,-41.587 -9.219,-45.63 cw(c-11.759,-45.63) -9.963,-47.426 v1(-11.503,-48.967)
  SIG 01 w0.203: v1(-17.177,-56.88) -17.177,-48.883 cw(c-16.118,-48.883) -16.118,-47.824 -12.165,-47.824 cw(c-12.165,-48.486) -11.503,-48.486 v1(-11.503,-48.967)
IN2_3: D19.2 U2.88 U7.2 | length 60
  Top Layer w0.203: U2.88@-13.003,-61.396 -12.606,-61.697 -12.363,-61.887 -11.374,-62.658 -11.319,-62.701 -8.648,-62.701 v1(-6.915,-64.435) ; v1(27.967,-58.111) 39.633,-58.111 40.163,-57.581 D19.2@40.163,-56.327 40.163,-55.985 40.568,-55.581 U7.2@40.568,-55.176
  SIG 01 w0.203: v1(-6.915,-64.435) -5.772,-64.435 ccw(c-5.772,-61.895) -3.976,-63.691 -3.737,-63.453 cw(c-0.148,-65.594) 1.993,-62.005 ccw(c8.662,-49.705) 4.389,-63.028 ccw(c10.086,-45.261) 22.354,-59.319 cw(c23.975,-60.94) 23.975,-58.648 26.671,-58.648 ccw(c26.671,-56.816) v1(27.967,-58.111)
IN2_4: D23.2 U2.56 U9.2 | length 80.6
  Top Layer w0.203: v1(0.003,-63.645) 0.003,-63.294 cw(c0.852,-63.294) 0.252,-62.694 0.322,-62.604 U2.56@0.634,-62.215 ; U9.2@39.167,-30.262 40.047,-30.262 40.05,-30.265 D23.2@40.067,-30.265 42.054,-30.265 ; 42.055,-30.265 ccw(c42.055,-29.062) 43.258,-29.062 v1(43.258,-28.292)
  SIG 01 w0.203: v1@-0.014,-63.642 cw(c0.85,-63.779) 0.849,-62.905 cw(c0.849,-64.952) 1.805,-63.142 1.861,-63.171 ccw(c16.529,-29.774) 2.926,-63.619 ccw(c10.25,-45.438) 22.426,-60.798 cw(c22.94,-61.611) 22.94,-60.649 26.817,-60.649 ccw(c26.817,-58.317) 28.188,-60.203 ccw(c26.817,-58.317) 28.465,-59.966 ccw(c26.884,-58.384) 29.12,-58.384 29.12,-36.627 cw(c33.188,-36.627) 33.188,-32.559 39.299,-32.559 ccw(c39.299,-31.29) 40.568,-31.29 40.568,-29.804 cw(c42.08,-29.804) 42.08,-28.292 v1(43.258,-28.292)
IN2_5: D27.2 U2.58 U10.2 | length 45.6
  Top Layer w0.203: v1(-2.166,-68.881) -2.666,-64.811 -0.463,-61.991 U2.58@-0.154,-61.599 ; U10.2@12.738,-76.981 13.137,-76.981 13.563,-77.406 D27.2@13.889,-77.406 17.651,-77.406 18.614,-78.369 v1(18.614,-80.324)
  SIG 01 w0.203: v1(-2.166,-68.881) -2.162,-68.885 -0.624,-68.885 cw(c-0.624,-69.888) 0.084,-69.178 cw(c-0.401,-69.665) 0.286,-69.664 0.286,-69.666 0.286,-73.232 0.286,-73.242 ccw(c7.594,-73.258) 5.403,-80.229 5.41,-80.231 ccw(c11.823,-54.104) 10.916,-80.991 ccw(c12.002,-48.82) v1@18.629,-80.32
IN2_6: D31.2 U2.60 U8.2 | length 36.9
  Top Layer w0.203: v1(-3.956,-66.745) -4.158,-65.096 -1.251,-61.375 U2.60@-0.942,-60.983 ; U8.2@20.165,-70.787 20.571,-70.787 20.975,-71.191 21.438,-71.191 21.658,-71.41 v1(21.756,-71.41)
  SIG 01 w0.203: v1(-3.956,-66.745) cw(c-2.299,-68.402) -2.299,-66.058 -0.057,-66.058 cw(c-0.057,-68.956) 1.992,-66.907 4.777,-69.692 4.778,-69.693 ccw(c10.298,-64.173) 10.298,-71.98 21.187,-71.98 ccw(c21.187,-71.41) v1(21.756,-71.41)
IPROPI_1: R5.2 U3.1 U6.1 | length 3.3
  Top Layer w0.254: U6.1@-18.206,-55.452 R5.2@-16.361,-55.452 ; R5.2@-16.234,-55.452 -16.018,-55.236 -14.928,-55.236 -14.926,-55.234 U3.1@-14.926,-55.16
IPROPI_2: R7.2 U5.1 U11.1 | length 3
  Top Layer w0.254: U5.1@-13.088,-31.409 -13.019,-31.409 -13.017,-31.411 -13.017,-32.599 R7.2@-12.811,-32.806 -12.684,-32.679 U11.1@-11.423,-32.679
IPROPI_3: R9.2 U7.1 U14.1 | length 3.4
  Top Layer w0.254: U14.1@36.813,-55.466 R9.2@38.633,-55.466 38.697,-55.466 38.903,-55.261 40.066,-55.261 40.068,-55.259 U7.1@40.068,-55.174 ; R9.2@38.876,-55.478 R9.2@38.887,-55.466
IPROPI_4: R11.2 U9.1 U12.1 | length 3.1
  Top Layer w0.254: U9.1@39.166,-30.761 39.252,-30.761 39.254,-30.763 39.254,-32.072 R11.2@39.459,-32.277 U12.1@40.87,-32.277
IPROPI_5: R12.2 U4.1 U10.1 | length 3.2
  Top Layer w0.203: U10.1@12.736,-77.481 12.766,-77.481 12.789,-77.504 12.789,-78.494 R12.2@13.029,-78.733 U4.1@14.606,-78.733 U4.1@14.343,-78.733
IPROPI_6: R10.2 U8.1 U13.1 | length 3.1
  Top Layer w0.203: U8.1@20.164,-71.286 20.248,-71.286 U8.1@20.25,-71.288 ; U8.1@20.25,-71.286 U8.1@20.25,-71.288 ; R10.2@20.456,-72.55 20.25,-72.343 U8.1@20.25,-71.288
  Top Layer w0.254: U13.1@20.456,-74.165 R10.2@20.456,-72.55
M1_OUT1: J1.1 J4.1 U3.6
  other v1: -13.054,-48.967 -12.961,-34.621
M1_OUT2: J1.2 J4.2 U3.8
  other v1: -14.634,-48.967 -14.939,-34.146
M2_OUT1: J5.1 J8.1 U5.6
  other v1: -20.997,-43.481 -17.124,-27.567
M2_OUT2: J5.2 J8.2 U5.8
  other v1: -19.671,-43.481 -17.458,-30.142
M3_OUT1: J2.1 J12.1 U7.6
  other v1: 41.962,-48.739 41.888,-35.834
M3_OUT2: J2.2 J12.2 U7.8
  other v1: 40.446,-48.739 40.568,-35.834
M4_OUT1: J6.1 J13.1 U9.6
  other v1: 33.851,-43.445 30.939,-31.543
M4_OUT2: J6.2 J13.2 U9.8
  other v1: 35.384,-43.445 32.31,-31.543
M5_OUT1: J3.1 U10.6
  other v1: 8.309,-76.735
M5_OUT2: J3.2 U10.8
  other v1: 7.113,-76.481
M6_OUT1: J7.1 U8.6
  other v1: 13.719,-69.321
M6_OUT2: J7.2 U8.8
  other v1: 13.719,-70.911
NetC5_2: C5.2 U2.49 | length 3.7
  Top Layer w0.203: U2.49@2.598,-66.604 2.204,-66.298 1.962,-66.109 1.959,-66.106 1.959,-65.788 2.97,-64.578 2.976,-64.572 3.036,-64.512 3.463,-64.512 3.739,-64.788 C5.2@3.854,-64.788
NetC6_2: C6.2 U2.73 | length 2.4
  Top Layer w0.203: U2.73@-6.064,-56.982 -5.751,-56.594 -5.238,-55.9 -5.238,-55.456 -5.564,-55.13 C6.2@-5.655,-55.039
NetC20_1: C20.1 J11.13 J11.14 R25.1 | length 36.7
  Bottom Layer w0.381: R25.1@0.301,-7.46 0.364,-7.46 0.555,-7.269 0.555,-6.882 0.839,-6.598 1.445,-6.598 C20.1@2.017,-6.027 2.402,-6.412 3.876,-6.412 3.912,-6.412 J11.13@4.066,-6.412 3.876,-6.602 3.876,-13.743 5.374,-15.24 17.944,-15.24 20.251,-12.933 20.251,-6.597 J11.14@20.066,-6.412
NetJ14_A5: J14.A5 R17.1 | length 5.1
  Bottom Layer w0.203: R17.1@-6.844,-18.767 -6.844,-20.259 -5.069,-22.034 J14.A5@-3.989,-22.034
NetJ14_B5: J14.B5 R18.1 | length 2.5
  Bottom Layer w0.241: J14.B5@-2.259,-23.534 R18.1@0.266,-23.534
NetLED1_2: LED1.2 R13.1 | length 2
  Top Layer w0.254: R13.1@-3.785,-8.41 LED1.2@-1.799,-8.41
NetLED1_4: LED1.4 R14.1 | length 1.8
  Top Layer w0.305: R14.1@-0.647,-10.033 -0.482,-9.957 -0.482,-9.07 LED1.4@-0.199,-8.41
NetLED1_6: LED1.6 R15.1 | length 1.5
  Top Layer w0.254: R15.1@1.401,-10.033 LED1.6@1.401,-8.522
NetQ1_3: Q1.3 R20.2 | length 2.5
  Top Layer w0.305: R20.2@32.533,-67.326 Q1.3@35.017,-67.326
NetQ2_3: Q2.3 R21.2 | length 3.7
  Top Layer w0.305: R21.2@32.534,-64.177 32.534,-63.118 33.005,-62.647 Q2.3@35.017,-62.647
NetR3_2: R3.2 R4.2 SW3.1 | length 3.5
  Top Layer w0.203: SW3.1@-20.382,-22.717 -20.026,-22.966 -19.833,-24.064 R3.2@-19.006,-24.642 ; R4.2@-19.607,-25.513 -19.433,-25.293 R3.2@-19.078,-24.747